# Altium PCB EMG-Arm-ELEC-V1.0.PcbDoc (part 5 of 5)
Units mil, origin at the board's own origin, x right, y up, seen from the top; angles counter-clockwise.
Board outline 8303.83 x 7532.25 mil, 2 copper layers (Top Layer, Bottom Layer), stack 3.556 mil thick; 303 components, 183 nets, 804 pads, 233 vias.
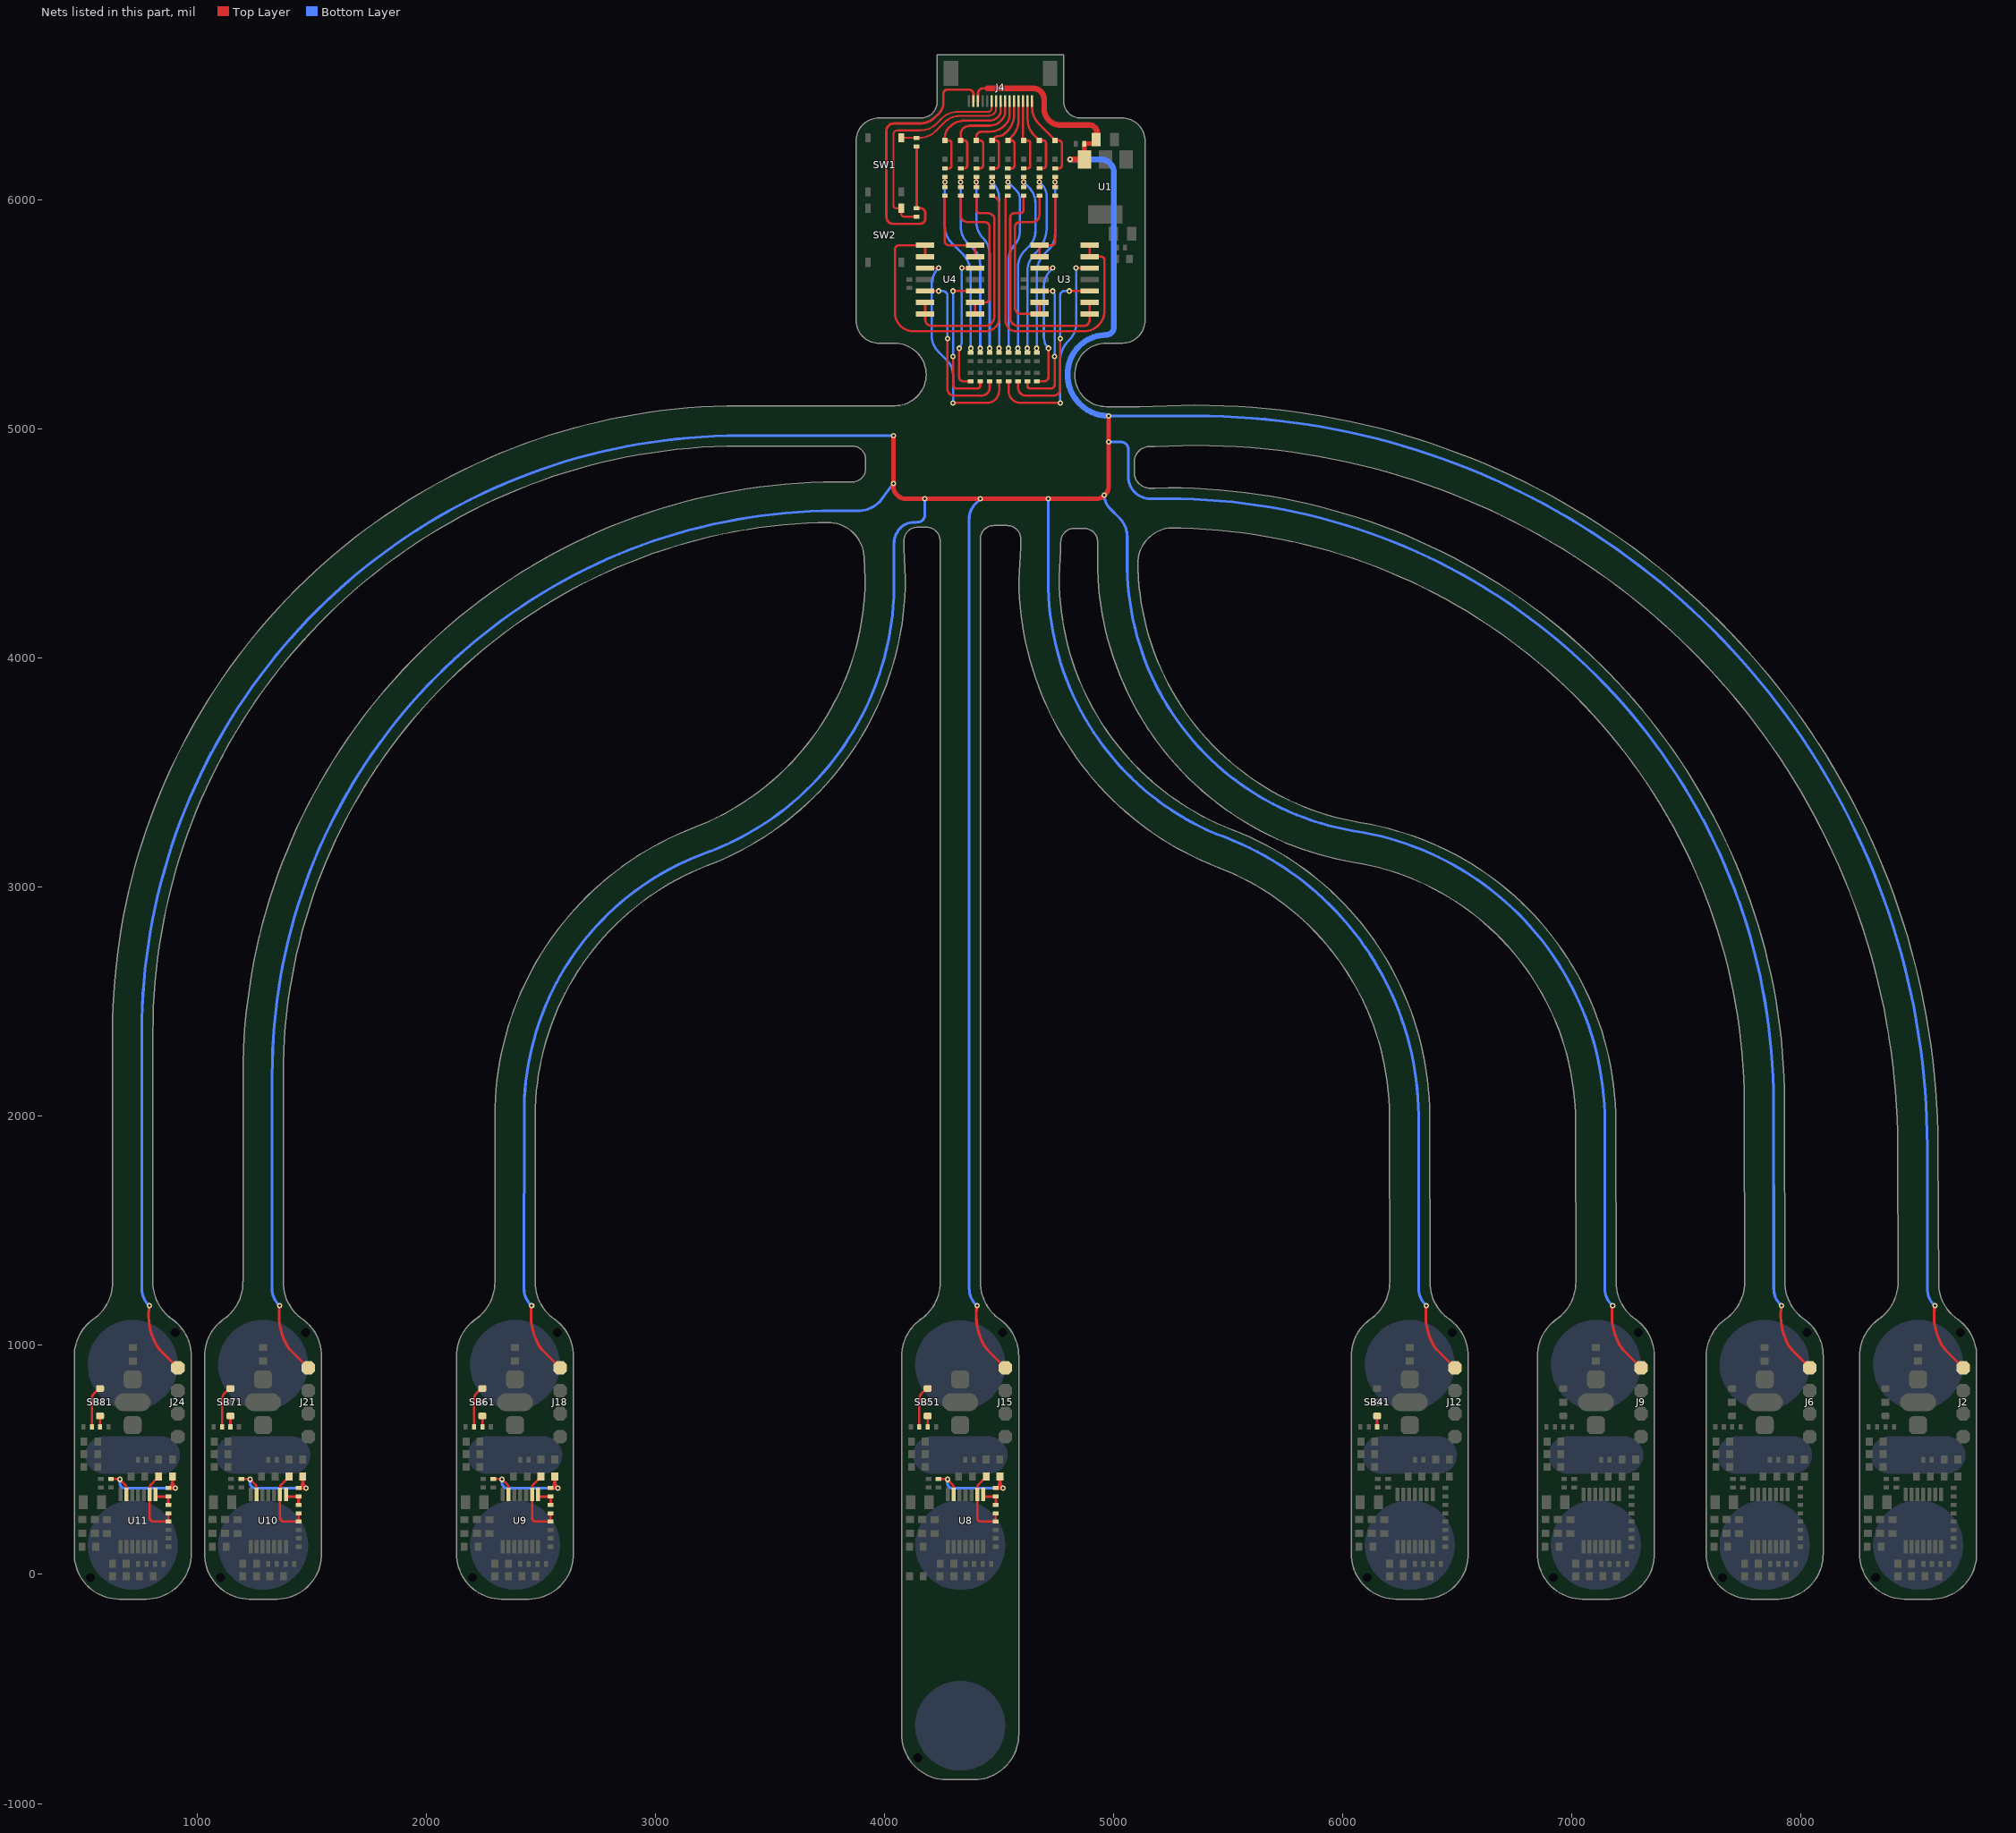
[diagram p4: the nets of this part, all layers, seen from the top]

## Via types
v1: diameter 23.62, hole 11.81, Top Layer to Bottom Layer, tented both sides, 233 vias

## Nets (pads, with @x,y where several pads share a name; then routed paths per layer and width w, separated by ;. In a path a pad name is that pad's centre, name@x,y a point inside that pad or via, vN(x,y) a via of type N, cw(c..) or ccw(c..) an arc to the next point about the centre after c; other vN are vias at no path point) (continued)
NetR53_1: R53.1 SB41.3 | length 47.7
  Top Layer w10: R53.1@6151.58,644.29 SB41.3@6151.58,691.97
NetR63_1: R63.1 R64.1 R68.1 U8.2 | length 304.5
  Top Layer w10: R63.1@4433.06,414.12 4411.92,392.97 ccw(c4426.01,378.88) 4406.08,378.88 U8.2@4406.08,349.35 4406.08,247.87 ccw(c4422.81,247.87) 4422.81,231.14 R68.1@4483.25,231.14 ; R68.1@4487.25,231.14 R64.1@4487.25,267.19 R64.1@4492.42,267.19
NetR63_2: R63.2 R67.2 R69.2 U8.6 | length 516.4
  Top Layer w10: R67.2@4236.85,416.63 v1@4274.22,416.63 ; v1@4276.73,414.12 4297.88,392.97 cw(c4283.78,378.88) 4303.72,378.88 U8.6@4303.72,349.35
  Top Layer w15: R69.2@4487.25,377.15 4505.33,377.15 ; R69.2@4496.92,380.47 ccw(c4476.6,400.79) 4505.33,400.79 ; R69.2@4497.79,376.35 v1@4515.87,376.35 ; 4505.33,377.35 R63.2@4505.33,428.23 ; 4505.33,402.79 ccw(c4534.06,402.79) v1@4513.74,382.47
  Bottom Layer w12: v1(4275.85,415) 4275.85,398.05 ccw(c4296.55,398.05) 4296.55,377.35 v1(4518.87,377.35)
NetR64_2: R64.2 R69.1 U8.1 | length 84.5
  Top Layer w12: U8.1@4434.53,340.29 R69.1@4483.1,340.29 ; R64.2@4487.25,304.19 R69.1@4487.25,340.15
NetR65_2: R65.2 SB51.1 | length 182.7
  Top Layer w10: R65.2@4153.46,644.3 4153.46,766.03 cw(c4189.42,766.03) 4166.43,793.68 4179.42,804.47 SB51.1@4189.42,811.97
NetR66_1: R66.1 SB51.3 | length 47.7
  Top Layer w10: R66.1@4189.42,644.3 SB51.3@4189.42,691.97
NetR76_1: R76.1 R77.1 R81.1 U9.2 | length 304.5
  Top Layer w10: R76.1@2489.58,414.11 2468.43,392.97 ccw(c2482.53,378.87) 2462.6,378.87 U9.2@2462.6,349.35 2462.6,247.87 ccw(c2479.33,247.87) 2479.33,231.14 R81.1@2539.76,231.14 ; R81.1@2543.76,231.14 R77.1@2543.76,267.19 R77.1@2548.94,267.19
NetR76_2: R76.2 R80.2 R82.2 U9.6 | length 516.4
  Top Layer w10: R80.2@2293.36,416.63 v1@2330.74,416.63 ; v1@2333.25,414.11 2354.4,392.97 cw(c2340.3,378.87) 2360.23,378.87 U9.6@2360.23,349.35
  Top Layer w15: R82.2@2543.76,377.15 2561.85,377.15 ; R82.2@2553.43,380.47 ccw(c2533.12,400.79) 2561.85,400.79 ; R82.2@2554.3,376.35 v1@2572.39,376.35 ; 2561.85,377.35 R76.2@2561.85,428.23 ; 2561.85,402.79 ccw(c2590.57,402.79) v1@2570.26,382.47
  Bottom Layer w12: v1(2332.36,415) 2332.36,398.05 ccw(c2353.07,398.05) 2353.07,377.35 v1(2575.39,377.35)
NetR77_2: R77.2 R82.1 U9.1 | length 84.5
  Top Layer w12: U9.1@2491.04,340.29 R82.1@2539.62,340.29 ; R77.2@2543.76,304.19 R82.1@2543.76,340.15
NetR78_2: R78.2 SB61.1 | length 182.7
  Top Layer w10: R78.2@2209.98,644.29 2209.98,766.03 cw(c2245.93,766.03) 2222.95,793.68 2235.93,804.47 SB61.1@2245.93,811.97
NetR79_1: R79.1 SB61.3 | length 47.7
  Top Layer w10: R79.1@2245.93,644.29 SB61.3@2245.93,691.97
NetR89_1: R89.1 R90.1 R94.1 U10.2 | length 304.5
  Top Layer w10: R89.1@1389.8,414.12 1368.65,392.97 ccw(c1382.75,378.87) 1362.81,378.87 U10.2@1362.81,349.35 1362.81,247.87 ccw(c1379.54,247.87) 1379.54,231.14 R94.1@1439.98,231.14 ; R94.1@1443.98,231.14 R90.1@1443.98,267.19 R90.1@1449.15,267.19
NetR89_2: R89.2 R93.2 R95.2 U10.6 | length 516.4
  Top Layer w10: R93.2@1193.58,416.63 v1@1230.95,416.63 ; v1@1233.47,414.12 1254.61,392.97 cw(c1240.52,378.87) 1260.45,378.87 U10.6@1260.45,349.35
  Top Layer w15: R95.2@1443.98,377.15 1462.06,377.15 ; R95.2@1453.65,380.47 ccw(c1433.33,400.79) 1462.06,400.79 ; R95.2@1454.52,376.35 v1@1472.6,376.35 ; 1462.06,377.35 R89.2@1462.06,428.23 ; 1462.06,402.79 ccw(c1490.79,402.79) v1@1470.48,382.47
  Bottom Layer w12: v1(1232.58,415) 1232.58,398.05 ccw(c1253.29,398.05) 1253.29,377.35 v1(1475.6,377.35)
NetR90_2: R90.2 R95.1 U10.1 | length 84.5
  Top Layer w12: U10.1@1391.26,340.29 R95.1@1439.83,340.29 ; R90.2@1443.98,304.19 R95.1@1443.98,340.15
NetR91_2: R91.2 SB71.1 | length 182.7
  Top Layer w10: R91.2@1110.19,644.29 1110.19,766.03 cw(c1146.15,766.03) 1123.17,793.68 1136.15,804.47 SB71.1@1146.15,811.97
NetR92_1: R92.1 SB71.3 | length 47.7
  Top Layer w10: R92.1@1146.15,644.29 SB71.3@1146.15,691.97
NetR102_1: R102.1 R103.1 R107.1 U11.2 | length 304.5
  Top Layer w10: R102.1@820.82,414.11 799.67,392.97 ccw(c813.77,378.87) 793.84,378.87 U11.2@793.84,349.35 793.84,247.87 ccw(c810.57,247.87) 810.57,231.14 R107.1@871,231.14 ; R107.1@875,231.14 R103.1@875,267.19 R103.1@880.18,267.19
NetR102_2: R102.2 R106.2 R108.2 U11.6 | length 516.4
  Top Layer w10: R106.2@624.6,416.63 v1@661.98,416.63 ; v1@664.49,414.11 685.64,392.97 cw(c671.54,378.87) 691.47,378.87 U11.6@691.47,349.35
  Top Layer w15: R108.2@875,377.15 893.09,377.15 ; R108.2@884.67,380.47 ccw(c864.36,400.79) 893.09,400.79 ; R108.2@885.54,376.35 v1@903.63,376.35 ; 893.09,377.35 R102.2@893.09,428.23 ; 893.09,402.79 ccw(c921.82,402.79) v1@901.5,382.47
  Bottom Layer w12: v1(663.6,415) 663.6,398.05 ccw(c684.31,398.05) 684.31,377.35 v1(906.63,377.35)
NetR103_2: R103.2 R108.1 U11.1 | length 84.5
  Top Layer w12: U11.1@822.28,340.29 R108.1@870.86,340.29 ; R103.2@875,304.19 R108.1@875,340.15
NetR104_2: R104.2 SB81.1 | length 182.7
  Top Layer w10: R104.2@541.22,644.29 541.22,766.03 cw(c577.17,766.03) 554.19,793.68 567.17,804.47 SB81.1@577.17,811.97
NetR105_1: R105.1 SB81.3 | length 47.7
  Top Layer w10: R105.1@577.17,644.29 SB81.3@577.17,691.97
NetSB91_1: SB91.1 U3.1 U3.2 | length 328
  Top Layer w10: U3.2@4677.98,5753.82 U3.1@4677.98,5803.82 4731.32,5803.82 ccw(c4731.32,5818.52) 4746.02,5818.52 SB91.1@4746.02,6020.12
NetSB92_1: SB92.1 U3.6 U3.7 | length 746.6
  Top Layer w10: SB92.1@4677.28,6020.12 4677.28,5935.42 cw(c4646.31,5935.42) 4646.31,5904.45 4591.6,5904.45 ccw(c4591.6,5883.85) 4571,5883.85 4571,5529.1 ccw(c4596.28,5529.1) 4596.28,5503.82 U3.7@4677.98,5503.82 U3.6@4677.98,5553.82
NetSB93_1: SB93.1 U3.8 U3.9 | length 1035.9
  Top Layer w10: SB93.1@4608.54,6020.12 4608.54,5959.85 cw(c4591.6,5959.85) 4591.6,5942.91 4566.53,5942.91 ccw(c4566.53,5926.42) 4550.03,5926.42 4550.03,5485.6 ccw(c4583.78,5485.6) 4583.78,5451.86 4872.83,5451.86 ccw(c4872.83,5475.06) 4896.02,5475.06 U3.8@4896.02,5503.82 U3.9@4896.02,5553.82
NetSB94_1: SB94.1 U3.13 U3.14 | length 1406.7
  Top Layer w10: SB94.1@4539.8,6020.12 4536.3,6020.12 4532.3,6016.12 4532.3,6012.61 4529.96,6010.26 4529.96,5474.84 ccw(c4577.02,5474.84) 4577.02,5427.78 4871.04,5427.78 ccw(c4871.04,5518.79) 4962.06,5518.79 4962.06,5738.3 ccw(c4946.54,5738.3) 4946.54,5753.82 U3.13@4896.02,5753.82 U3.14@4896.02,5803.82
NetSB95_1: SB95.1 U4.1 U4.2 | length 1551.7
  Top Layer w10: U4.2@4178.96,5753.82 U4.1@4178.96,5803.82 4066.46,5803.82 ccw(c4066.46,5784.24) 4046.88,5784.24 4046.88,5509.02 ccw(c4128.12,5509.02) 4128.12,5427.78 4442,5427.78 ccw(c4442,5488.05) 4502.28,5488.05 4502.28,5984.72 ccw(c4471.06,5984.72) 4485.82,6012.22 4478.56,6016.12 SB95.1@4471.06,6020.12
NetSB96_1: SB96.1 U4.6 U4.7 | length 1003.4
  Top Layer w10: U4.6@4178.96,5553.82 U4.7@4178.96,5503.82 4178.96,5479.04 ccw(c4206.14,5479.04) 4206.14,5451.86 4439.86,5451.86 ccw(c4439.86,5493.41) 4481.41,5493.41 4481.41,5915.95 ccw(c4454.45,5915.95) 4454.45,5942.91 4419.26,5942.91 cw(c4419.26,5959.85) 4402.32,5959.85 SB96.1@4402.32,6020.12
NetSB97_1: SB97.1 U4.8 U4.9 | length 675.1
  Top Layer w10: SB97.1@4333.58,6020.12 4333.58,5935.42 ccw(c4364.55,5935.42) 4364.55,5904.45 4438.14,5904.45 cw(c4438.14,5882.82) 4459.77,5882.82 4459.77,5571.59 cw(c4442,5571.59) 4442,5553.82 U4.9@4397,5553.82 U4.8@4397,5503.82
NetSB98_1: SB98.1 U4.13 U4.14 | length 391
  Top Layer w10: SB98.1@4264.84,6020.12 4264.84,5821.22 ccw(c4282.25,5821.22) 4282.25,5803.82 U4.14@4397,5803.82 4397,5801 U4.13@4397,5753.82
NetSB101_2: SB101.2 U3.3 | length 612.6
  Top Layer w10: SB101.2@4666.06,5209.85 4698.63,5209.85 ccw(c4698.63,5228.35) 4717.13,5228.35 v1(4717.13,5353.88) ; U3.3@4677.98,5703.82 v1(4736.02,5703.82)
  Bottom Layer w10: v1(4717.13,5353.88) cw(c4766.45,5403.2) 4696.7,5403.2 4696.7,5623.08 cw(c4796.7,5623.08) 4725.99,5693.79 v1(4736.02,5703.82)
NetSB102_2: SB102.2 U3.5 | length 624.2
  Top Layer w10: SB102.2@4624.92,5209.85 4624.92,5189.68 ccw(c4636.6,5189.68) 4636.6,5178 4726.55,5178 ccw(c4726.55,5195.25) 4743.8,5195.25 v1(4743.8,5317.66) ; U3.5@4677.98,5603.82 v1(4736.02,5603.82)
  Bottom Layer w10: v1(4736.02,5603.82) cw(c4717.23,5585.03) 4738.63,5600.79 cw(c4717.23,5585.03) 4743.8,5585.03 v1(4743.8,5317.66)
NetSB103_2: SB103.2 U3.10 | length 796.4
  Top Layer w10: SB103.2@4583.78,5209.85 4583.78,5182.35 ccw(c4619.13,5182.35) 4619.13,5147 4739.86,5147 ; 4739.9,5147 ccw(c4739.9,5175.23) 4768.13,5175.23 v1(4768.13,5396.64) ; v1(4807.98,5603.82) U3.10@4896.02,5603.82
  Bottom Layer w10: v1(4768.13,5396.64) 4768.13,5584.58 cw(c4787.37,5584.58) 4787.37,5603.82 v1(4807.98,5603.82)
NetSB104_2: SB104.2 U3.12 | length 964.4
  Top Layer w10: SB104.2@4542.64,5209.85 4542.64,5168.25 ccw(c4595.89,5168.25) 4595.89,5115 v1(4768.13,5115) ; v1(4837.98,5703.82) U3.12@4896.02,5703.82
  Bottom Layer w10: v1(4768.13,5115) 4768.13,5297.52 ; 4768.13,5297.57 cw(c4895.06,5297.57) 4805.32,5387.34 4808.7,5390.71 ccw(c4737.98,5461.42) 4837.98,5461.42 v1(4837.98,5703.82) ; v1@4831.46,5703.82 v1@4832.07,5703.2
NetSB105_2: SB105.2 U4.3 | length 958.6
  Top Layer w10: U4.3@4178.96,5703.82 v1(4237,5703.82) ; v1(4300.33,5115) 4448.24,5115 ccw(c4448.24,5168.25) 4501.49,5168.25 SB105.2@4501.49,5209.85
  Bottom Layer w10: v1(4237,5703.82) 4236.39,5703.2 ccw(c4307.1,5632.49) 4207.1,5632.49 4207.1,5409.43 ccw(c4307.1,5409.43) 4236.39,5338.72 4274.63,5300.47 cw(c4212.6,5238.44) 4300.33,5238.44 v1(4300.33,5115)
NetSB106_2: SB106.2 U4.5 | length 764.8
  Top Layer w10: U4.5@4178.96,5603.82 v1(4237,5603.82) ; v1(4276,5396.64) 4276,5175.23 ccw(c4304.23,5175.23) 4304.23,5147 ; 4304.27,5147 4425,5147 ccw(c4425,5182.35) 4460.35,5182.35 SB106.2@4460.35,5209.85
  Bottom Layer w10: v1(4237,5603.82) 4255.18,5603.82 cw(c4255.18,5583) 4276,5583 4276,5508.32 v1(4276,5396.64)
NetSB107_2: SB107.2 U4.10 | length 660.8
  Top Layer w10: v1(4300.33,5317.66) 4300.33,5195.25 ccw(c4317.58,5195.25) 4317.58,5178 4407.53,5178 ccw(c4407.53,5189.68) 4419.21,5189.68 SB107.2@4419.21,5209.85 ; v1(4300.33,5603.82) U4.10@4397,5603.82
  Bottom Layer w10: v1(4300.33,5317.66) v1(4300.33,5603.82)
NetSB108_2: SB108.2 U4.12 | length 598.3
  Top Layer w10: v1(4327,5353.88) 4327,5228.35 ccw(c4345.5,5228.35) 4345.5,5209.85 SB108.2@4378.06,5209.85 ; v1(4338.96,5703.82) U4.12@4397,5703.82
  Bottom Layer w10: v1(4327,5353.88) ccw(c4298.11,5382.76) 4338.96,5382.76 v1(4338.96,5703.82)
SENSOR1: R23.2 SB01.2 SB91.2 | length 814.6
  Top Layer w10: SB91.2@4746.02,6056.83 SB91.2@4746.02,6057.12 v1(4746.02,6079.67) R23.2@4746.02,6102.5
  Top Layer w15: SB01.2@4666.06,5334.35 v1(4666.06,5353.88)
  Bottom Layer w10: v1(4666.06,5353.88) 4666.06,5682.39 ; 4666.06,5682.44 cw(c4786.29,5682.44) 4701.32,5767.49 4716.73,5782.91 ; 4716.77,5782.94 ccw(c4646.02,5853.62) 4746.02,5853.62 v1(4746.02,6079.67)
SENSOR1_O: D8.2 J4.15 R23.1 | length 377.9
  Top Layer w10: J4.15@4645.65,6432.31 4645.65,6404.35 ccw(c4745.65,6404.35) 4674.94,6333.64 4746.02,6262.56 D8.2@4746.02,6261 4763.21,6261 cw(c4763.21,6249.19) 4775.02,6249.19 4775.02,6151.31 cw(c4763.21,6151.31) 4763.21,6139.5 R23.1@4746.02,6139.5
SENSOR2: R22.2 SB02.2 SB92.2 | length 825
  Top Layer w10: SB92.2@4677.28,6056.83 SB92.2@4677.28,6057.12 v1(4677.28,6079.67) R22.2@4677.28,6102.5
  Top Layer w15: SB02.2@4624.92,5334.35 v1(4624.92,5353.88)
  Bottom Layer w10: v1(4624.92,5353.88) 4624.92,5691.65 cw(c4724.92,5691.65) 4654.21,5762.36 4662.1,5770.25 ccw(c4547.18,5885.2) 4709.72,5885.2 ; v1(4677.28,6079.67) 4687.44,6069.5 cw(c4633.66,6015.72) 4709.72,6015.72 4709.72,5885.24
SENSOR2_O: D7.2 J4.14 R22.1 | length 357.6
  Top Layer w10: J4.14@4625.97,6432.31 4625.97,6353.73 ccw(c4725.97,6353.73) 4655.26,6283.02 D7.2@4677.28,6261 4694.47,6261 cw(c4694.47,6249.19) 4706.28,6249.19 4706.28,6151.31 cw(c4694.47,6151.31) 4694.47,6139.5 R22.1@4677.28,6139.5
SENSOR3: R20.2 SB03.2 SB93.2 | length 811.4
  Top Layer w10: SB93.2@4608.54,6056.83 SB93.2@4608.54,6057.12 v1(4608.54,6079.67) R20.2@4608.54,6102.5
  Bottom Layer w10: v1(4583.78,5353.88) 4583.78,5708.85 cw(c4683.78,5708.85) 4613.07,5779.56 4630.71,5797.21 ccw(c4560,5867.92) 4660,5867.92 4660,5986.79 ccw(c4560,5986.79) 4630.71,6057.5 v1(4608.54,6079.67)
SENSOR3_O: D6.2 J4.13 R20.1 | length 341.3
  Top Layer w10: J4.13@4606.28,6432.31 4606.28,6266.45 ccw(c4614,6266.45) D6.2@4608.54,6261 4625.73,6261 cw(c4625.73,6249.19) 4637.54,6249.19 4637.54,6151.31 cw(c4625.73,6151.31) 4625.73,6139.5 R20.1@4608.54,6139.5
SENSOR4: R19.2 SB04.2 SB94.2 | length 823.1
  Top Layer w10: SB94.2@4539.8,6056.83 SB94.2@4539.8,6057.12 v1(4539.8,6079.67) R19.2@4539.8,6102.5
  Top Layer w15: SB04.2@4542.64,5334.35 v1(4542.64,5353.88)
  Bottom Layer w10: v1(4539.8,6079.67) 4576.7,6042.77 cw(c4537.74,6003.8) 4592.84,6003.8 4592.84,5868.84 cw(c4492.84,5868.84) 4572.85,5808.85 cw(c4492.84,5868.84) 4563.55,5798.13 4562.63,5797.21 ccw(c4642.64,5737.21) 4542.64,5737.21 v1(4542.64,5353.88)
SENSOR4_O: D5.2 J4.12 R19.1 | length 355.8
  Top Layer w10: R19.1@4539.8,6139.5 4556.99,6139.5 ccw(c4556.99,6151.31) 4568.8,6151.31 4568.8,6249.19 ccw(c4556.99,6249.19) 4556.99,6261 D5.2@4539.8,6261 4557.31,6278.51 ccw(c4486.6,6349.22) 4586.6,6349.22 J4.12@4586.6,6432.31
SENSOR5: R18.2 SB05.2 SB95.2 | length 799.4
  Top Layer w10: SB95.2@4471.06,6056.83 SB95.2@4471.06,6057.12 v1(4471.06,6079.67) R18.2@4471.06,6102.5
  Top Layer w15: SB05.2@4501.49,5334.35 v1(4501.49,5353.88)
  Bottom Layer w10: v1(4471.06,6079.67) cw(c4404,6008.85) 4501.49,6008.85 v1(4501.49,5353.88)
SENSOR5_O: D4.2 J4.11 R18.1 | length 387.8
  Top Layer w10: R18.1@4471.06,6139.5 4488.25,6139.5 ccw(c4488.25,6151.31) 4500.06,6151.31 4500.06,6249.19 ccw(c4488.25,6249.19) 4488.25,6261 D4.2@4471.06,6261 4483.94,6273.88 cw(c4499.63,6258.19) 4489.05,6277.69 cw(c4499.63,6258.19) 4499.63,6280.38 ccw(c4499.63,6318.51) 4526.57,6291.53 4537.79,6302.74 ccw(c4467.96,6372.52) 4566.68,6372.56 J4.11@4566.68,6432.07
SENSOR6: R16.2 SB06.2 SB96.2 | length 806.5
  Top Layer w10: SB96.2@4402.32,6056.83 SB96.2@4402.32,6057.12 v1(4402.32,6079.67) R16.2@4402.32,6102.5
  Top Layer w15: SB06.2@4460.35,5334.35 v1(4460.35,5353.88)
  Bottom Layer w10: v1(4402.32,6079.67) 4402.32,5905.1 ccw(c4502.32,5905.1) 4431.61,5834.39 cw(c4362.23,5765.01) 4460.35,5765.01 v1(4460.35,5353.88)
SENSOR6_O: D3.2 J4.10 R16.1 | length 440.3
  Top Layer w10: R16.1@4402.32,6139.5 4419.51,6139.5 ccw(c4419.51,6151.31) 4431.32,6151.31 4431.32,6249.19 ccw(c4419.51,6249.19) 4419.51,6261 D3.2@4402.32,6261 4402.32,6278.62 cw(c4419.59,6278.62) 4407.38,6290.83 cw(c4428.83,6269.39) 4428.83,6299.72 4461.78,6299.72 ; 4461.82,6299.72 ccw(c4461.82,6388.15) 4524.36,6325.62 4528.95,6330.21 ccw(c4484.76,6374.37) 4547.23,6374.37 J4.10@4547.23,6432.31
SENSOR7: R15.2 SB07.2 SB97.2 | length 817.8
  Top Layer w10: SB97.2@4333.58,6056.83 SB97.2@4333.58,6057.12 v1(4333.58,6079.67) R15.2@4333.58,6102.5
  Top Layer w15: SB07.2@4419.21,5334.35 v1(4419.21,5353.88)
  Bottom Layer w10: v1(4333.58,6079.67) 4333.58,5885.67 ccw(c4433.58,5885.67) 4362.87,5814.96 4389.92,5787.91 cw(c4319.21,5717.2) 4419.21,5717.2 v1(4419.21,5353.88)
SENSOR7_O: D2.2 J4.9 R15.1 | length 489.8
  Top Layer w10: R15.1@4333.58,6139.5 4350.77,6139.5 ccw(c4350.77,6151.31) 4362.58,6151.31 4362.58,6249.19 ccw(c4350.77,6249.19) 4350.77,6261 D2.2@4333.58,6261 4333.58,6288.21 cw(c4368.65,6288.21) 4343.85,6313 cw(c4373.9,6282.95) 4373.9,6325.45 4459.42,6325.45 ccw(c4459.42,6394.12) 4507.98,6345.56 4513.65,6351.23 ccw(c4480.08,6384.8) 4527.55,6384.8 J4.9@4527.54,6432.31
SENSOR8: R14.2 SB08.2 SB98.2 | length 828.2
  Top Layer w10: SB98.2@4264.84,6056.83 SB98.2@4264.84,6057.12 v1(4264.84,6079.67) R14.2@4264.84,6102.5
  Top Layer w15: SB08.2@4378.06,5334.35 v1(4378.06,5353.88)
  Bottom Layer w10: v1(4264.84,6079.67) 4264.84,5884.58 ccw(c4364.84,5884.58) 4294.13,5813.87 4341.5,5766.5 cw(c4253.23,5678.22) 4378.06,5678.23 v1(4378.06,5353.88)
SENSOR8_O: D1.2 J4.8 R14.1 | length 529.2
  Top Layer w10: R14.1@4264.84,6139.5 4282.03,6139.5 ccw(c4282.03,6151.31) 4293.84,6151.31 4293.84,6249.19 ccw(c4282.03,6249.19) 4282.03,6261 D1.2@4264.84,6261 4264.84,6275.08 cw(c4324.29,6275.08) 4282.26,6317.12 4283.87,6318.74 cw(c4354.58,6248.03) 4350.23,6347.93 cw(c4354.58,6248.03) 4354.58,6348.03 4457.81,6348.03 ccw(c4457.81,6405.31) 4498.32,6364.81 ccw(c4475.29,6387.84) 4507.86,6387.84 J4.8@4507.86,6432.31
SW1: J4.7 R17.1 SW1.3 | length 494.5
  Top Layer w8: SW1.3@4074.65,6272.18 R17.1@4141.67,6272.18 4153.24,6272.18 ccw(c4153.24,6372.18) 4223.95,6301.47 4261.19,6338.71 cw(c4331.9,6267.99) 4331.9,6367.99 4450.24,6367.99 ccw(c4450.24,6411.9) 4481.29,6380.86 ccw(c4464.66,6397.49) 4488.18,6397.49 J4.7@4488.18,6432.31
SW2: J4.6 R21.1 SW2.3 | length 954.4
  Top Layer w8: R21.1@4141.67,5928.18 4085.25,5928.18 cw(c4085.25,5938.78) 4074.65,5938.78 SW2.3@4074.65,5965.18 4051.83,5965.18 cw(c4051.83,5976.71) 4040.29,5976.71 4040.29,6288.05 cw(c4057.32,6288.05) 4057.32,6305.08 4157.57,6305.08 ccw(c4157.57,6405.08) 4228.28,6334.37 4250.63,6356.72 cw(c4321.34,6286.01) 4321.34,6386.01 4453.48,6386.01 ccw(c4453.48,6401.02) 4468.49,6401.02 J4.6@4468.49,6432.31
VBAT: C3.1 C4.2 J2.4 J4.3 J6.4 J9.4 J12.4 J15.4 J18.4 J21.4 J24.4 U1.3 | length 45927.3
  Top Layer w11: J4.3@4409.43,6432.31 4409.43,6467.12 cw(c4430.08,6467.12) 4415.48,6481.72 cw(c4432.52,6464.68) 4432.52,6488.78 4450.24,6488.78
  Top Layer w12: v1@792.53,1173.02 ccw(c1056.58,1131.86) 824.64,999.13 ccw(c1056.58,1131.86) 825,998.49 838.6,980.22 J24.4@916.65,902.17 ; v1@1361.51,1173.02 ccw(c1625.56,1131.86) 1393.62,999.13 ccw(c1625.56,1131.86) 1393.98,998.5 1407.58,980.22 J21.4@1485.63,902.17 ; v1@2461.29,1173.02 ccw(c2725.34,1131.86) 2493.4,999.13 ccw(c2725.34,1131.86) 2493.76,998.49 2507.36,980.22 J18.4@2585.41,902.17 ; v1@4404.78,1173.02 ccw(c4668.83,1131.86) 4436.88,999.13 ccw(c4668.83,1131.86) 4437.25,998.5 4450.84,980.22 J15.4@4528.9,902.17 ; v1@6366.94,1173.02 ccw(c6630.99,1131.86) 6399.05,999.13 ccw(c6630.99,1131.86) 6399.41,998.5 6413.01,980.22 J12.4@6491.06,902.17 ; v1@7179.65,1173.01 ccw(c7443.7,1131.86) 7211.76,999.12 ccw(c7443.7,1131.86) 7212.12,998.49 7225.72,980.21 J9.4@7303.78,902.16 ; v1@7916.4,1173.02 ccw(c8180.45,1131.86) 7948.51,999.13 ccw(c8180.45,1131.86) 7948.87,998.5 7962.47,980.22 J6.4@8040.53,902.17 ; v1@8585.88,1173.02 ccw(c8849.93,1131.86) 8617.99,999.13 ccw(c8849.93,1131.86) 8618.35,998.49 8631.95,980.22 J2.4@8710,902.17
  Top Layer w20: v1(4040,4971.89) v1(4040,4763.79) 4040,4751.1 ccw(c4094.21,4751.1) 4094.21,4696.89 v1(4177.12,4696.89) v1(4419.83,4696.89) v1(4716.26,4696.89) 4925.15,4696.89 ccw(c4925.15,4751.45) 4979.72,4751.45 v1(4979.72,4945) v1(4979.72,5057.89) ; C4.2@4873.23,6244.55 4873.23,6179.81 U1.3@4874.9,6178.15 ; C4.2@4873.36,6247.05 4915.45,6247.05 C3.1@4925.45,6257.05
  Top Layer w25: 4450.24,6488.78 4648.16,6488.78 cw(c4648.16,6438.33) 4698.61,6438.33 4698.61,6392.16 ccw(c4770.52,6400.09) 4770.52,6327.74 4867.76,6327.74 4896.89,6327.74 cw(c4896.89,6296.04) 4928.54,6297.77 4928.54,6296.84 4928.54,6295.58 4927.31,6282.38 C3.1@4925.45,6264.88 C3.1@4925.45,6257.05 ; v1(4811,6178.15) U1.3@4874.9,6178.15
  Bottom Layer w12: 758.93,1248.15 758.93,2366.67 cw(c3366.45,2364.36) 3368.75,4971.89 v1(4040,4971.89) ; 759.65,1247.42 ccw(c859.65,1247.42) 788.94,1176.71 v1(792.65,1173) ; v1(1361.63,1173) 1357.19,1177.44 cw(c1427.9,1248.15) 1327.9,1248.15 1327.9,1323.71 1328.53,2182.27 cw(c3786.93,2185.48) 3783.75,4643.89 3884.23,4643.89 3884.3,4643.89 ccw(c3884.35,4780) 3980.69,4683.85 ccw(c3972.15,4692.28) 3981.8,4685.14 3998.44,4707.62 v1(4040,4763.79) ; v1(2461.41,1173) 2456.98,1177.44 cw(c2527.69,1248.15) 2427.69,1248.15 2427.69,1323.71 2428.44,2002.78 cw(c3632.78,2018.42) 3240.11,3157.06 ccw(c2792.24,4324.9) 4042.9,4341.91 4042.9,4499.81 cw(c4142.9,4499.81) 4072.19,4570.52 cw(c4128.38,4514.33) 4128.38,4593.8 4135.58,4593.8 ccw(c4135.58,4652.54) 4145.38,4594.62 ccw(c4145.38,4626.36) 4166.22,4602.42 ccw(c4145.38,4626.36) 4177.12,4626.36 v1(4177.12,4696.89) ; v1(4404.9,1173) 4400.46,1177.44 cw(c4471.17,1248.15) 4400.12,1177.78 cw(c4471.17,1248.15) 4371.17,1248.15 4371.17,1342 4370.83,4547.57 4370.83,4606.47 cw(c4470.83,4606.47) 4400.12,4677.18 v1(4419.83,4696.89) ; v1(4716.26,4696.89) 4716.26,4341.81 ccw(c5911.96,4335.56) 5448.89,3233.15 cw(c5017.02,1989.97) 6333,2004.39 6333,1248.49 ccw(c6433,1248.49) 6362.29,1177.78 v1(6367.06,1173) ; v1(4961.02,4711.58) ccw(c5041.77,4711.58) 4984.67,4654.47 5030.44,4608.71 cw(c4947.67,4531.53) 5060.84,4531.53 5060.84,4429.76 ccw(c6242.63,4412.6) 6050.33,3246.43 cw(c5857.86,1973.04) 7145.71,1975.28 7145.88,1326.64 7145.88,1248.31 ccw(c7245.88,1248.31) 7175.17,1177.6 v1(7179.78,1172.99) ; v1(4979.72,4945) 5032.7,4945 cw(c5032.7,4911.89) 5065.81,4911.89 5065.81,4792.57 ccw(c5161.49,4792.57) 5161.49,4696.89 5240.75,4696.89 cw(c5242.95,2057.69) 7882.14,2059.89 7882.78,1342 7882.78,1248.17 ccw(c7982.78,1248.17) 7912.07,1177.46 v1(7916.53,1173) ; v1(4979.72,5057.89) 5359.75,5057.89 cw(c5361.7,1866.59) 8553,1868.53 ; 8553,1870.23 8553,1247.42 ccw(c8653,1247.42) 8582.29,1176.71 v1(8586,1173)
  Bottom Layer w25: v1(4811,6178.15) 4945.71,6178.15 cw(c4945.71,6121) 5002.85,6121 5002.85,5447.03 cw(c4967.75,5447.03) 4967.75,5411.92 ccw(c4970.19,5242.33) 4800.59,5240.77 4800.6,5239.38 ccw(c4981.15,5238.44) v1(4979.72,5057.89)
VCC_3V3: J4.2 R17.2 R21.2 | length 1457
  Top Layer w11: R17.2@4141.67,6235.18 R21.2@4141.67,5965.18 4158.67,5965.18 cw(c4158.67,5944.89) 4178.96,5944.89 4178.96,5919.18 cw(c4156.78,5919.18) 4156.78,5897 4039.44,5897 cw(c4039.44,5926.92) 4009.52,5926.92 4009.52,6303.11 cw(c4041.38,6303.11) 4041.38,6334.96 4153.48,6334.96 ccw(c4153.48,6434.96) 4224.19,6364.25 4239.01,6379.08 ccw(c4192.15,6425.94) 4258.42,6425.94 4258.42,6466.71 cw(c4274.48,6466.71) 4274.48,6482.78 4370.11,6482.78 cw(c4370.11,6463.13) 4389.75,6463.13 J4.2@4389.75,6432.31
pads on no net: J4.4 J4.5 SW1.1 SW1.4 SW2.1 SW2.4

## Polygon pours and split planes (outlines as drawn)
no net on Top Overlay "NONET_L01_P-001" (solid): 4205,-631.06 4205,-276.06 cw(c4305,-276.06) 4305,-176.06 4365,-176.06 cw(c4365,-276.06) 4465,-276.06 4465,-631.06 cw(c4365,-631.06) 4365,-731.06 4305,-731.06 cw(c4305,-631.06)
no net on Top Overlay "NONET_L01_P-001" (solid): 4222.7,-496.27 4222.7,-680 4441.74,-680 4441.51,-496.27 cw(c4332.11,-660) 4529.03,-660 cw(c4332.11,-660) 4332.11,-856.92 cw(c4332.11,-660) 4135.18,-660 cw(c4332.11,-660)
5V on Top Layer "5V_L01_P000" (hatched 45Degree grid 20 track 10, pour order 0): 4066,4984 cw(c4115,4984) 4115,5033 4914.93,5033 cw(c4914.93,5001.93) 4946,5001.93 4946,4979.54 4946,4770 cw(c4904,4770) 4904,4728 4122,4728 cw(c4122,4784) 4066,4784
GND on Bottom Layer "GND_L02_P002" (hatched 45Degree grid 20 track 10, remove dead copper, pour order 2): 3877.31,5520.34 5138.41,5520.34 5138.41,6259.25 ccw(c5038.42,6259.25) 5109.12,6329.96 5109.11,6329.98 ccw(c5038.43,6259.3) 5038.43,6359.25 4852.38,6359.25 cw(c4851.99,6415.94) 4811.46,6376.3 4796.54,6391.23 cw(c4826.33,6421.02) 4784.2,6421.02 4784.2,6636 4231.52,6636 4231.52,6421.01 cw(c4189.4,6421.01) 4219.18,6391.23 4204.26,6376.3 cw(c4163.51,6417.05) 4163.51,6359.42 3977.31,6359.42 ccw(c3977.31,6259.42) 3877.31,6259.42

## Other copper
Top Layer:
  rectangle net GND: 4382.4,488.73 4407.65,513.73
  rectangle net GND: 770.15,488.73 795.4,513.73
  rectangle net GND: 1339.13,488.73 1364.38,513.73
  rectangle net GND: 2438.91,488.73 2464.16,513.73
  rectangle net GND: 6344.56,488.73 6369.81,513.73
  rectangle net GND: 7157.28,488.72 7182.53,513.72
  rectangle net GND: 7894.02,488.73 7919.27,513.73
  rectangle net GND: 8563.5,488.72 8588.75,513.72

## Silkscreen, mask and mechanical layers (free items; w line width, h text height)
Top Overlay:
  circle w5: c4446.27,4935.21 r6
  circle w5: c4428.33,4870.91 r6
  circle w5: c4449.59,4855.89 r6
  circle w5: c4548.67,4829.98 r5
  circle w5: c4559.66,4815.07 r5
  circle w5: c4568.3,4798.58 r5
  circle w5: c4577.72,4782.1 r5
  circle w5: c4554.72,4954.02 r7.5
  circle w5: c4504.38,4907.7 r5
  circle w5: c4511.38,4891.22 r5
  circle w5: c4520.7,4875.52 r5
  pour cut-out: 4271.31,-580.46 4263.28,-580.46 4263.28,-748.9 4428.88,-748.9 4428.88,-594.67 4392.55,-594.67 4392.55,-256.24 4271.31,-256.24
  lines w5: 4428.33,4876.91 4439.33,4887.91 4448.33,4896.91 4484.33,4896.91 4484.33,4909.06 4469.23,4909.06 4466.18,4909.06 4459.33,4915.91 4448.33,4927.91 ; 4434.33,4870.91 4452.09,4888.67 4452.24,4888.67 4484.33,4888.67 4484.33,4878.18 4465.19,4859.03 4455.33,4859.03 ; 4453.33,4933.91 4469.51,4916.73 ; 4455.33,4851.8 4469.22,4851.8 4483.33,4865.91 4492.38,4874.96 4492.38,4879.88 4492.38,4949.91 4539.65,4949.91 4540.81,4951.07 ; 4477.34,4916.73 4469.51,4916.73 ; 4493.45,4782.1 4572.72,4782.1 ; 4498.16,4798.58 4563.3,4798.58 ; 4506.01,4814.28 4554.72,4814.28 ; 4509.38,4907.7 4562.53,4907.7 ; 4516.38,4891.22 4554.68,4891.22 ; 4520.14,4829.98 4543.67,4829.98 ; 4525.7,4875.52 4539.77,4875.52 ; 4531.13,4844.12 4541.34,4844.12 ; 4540.71,4951.55 cw(c4554.72,4954.02) 4540.71,4956.49 ; 4540.81,4956.98 4540.74,4956.91 4539.74,4957.91 4492.38,4957.91 4492.38,5011.96 4515.33,5034.91 4554.49,5034.91 4578.63,5010.29 4578.63,4920.27 cw(c4527.07,4920.27) 4563.53,4883.81 ; 4543.25,4945.99 ccw(c4554.72,4954.02) 4546.69,4942.55 ; 4543.25,4962.05 cw(c4554.72,4954.02) 4546.69,4965.49 ; 4548,4870 4519.25,4854.1 4495.66,4832.09 ccw(c4549.58,4778.17) 4473.33,4778.17 4486.38,4778.17 cw(c4561.24,4778.17) 4508.31,4831.11 4533.09,4855.89 4563.32,4883.37 ; 4552.25,4940.01 ccw(c4554.72,4954.02) 4557.19,4940.01 ; 4552.25,4968.03 cw(c4554.72,4954.02) 4557.19,4968.03 ; 4562.75,4942.55 ccw(c4554.72,4954.02) 4566.19,4945.99 ; 4562.75,4965.49 cw(c4554.72,4954.02) 4566.19,4962.05 ; 4563.64,4883.7 4580.59,4900.64 ccw(c4564.33,4916.91) 4587.33,4916.91 4587.33,4977.91 4587.33,5013.91 4582.33,5018.91 4558.33,5042.91 4484.33,4968.91 4484.33,4916.73 4469.5,4916.73 ; 4568.73,4951.55 ccw(c4554.72,4954.02) 4568.73,4956.49
  lines w15: 4228.26,4667.78 4262.8,4740 4266.72,4740 4299.7,4668.56 ; 4319.62,4740 4354.17,4740 cw(c4354.17,4703.05) 4391.12,4703.05 ; 4321.59,4696.82 4321.59,4668.56 4352.59,4668.56 4358.12,4668.56 ccw(c4358.12,4701.53) 4391.09,4701.53 4391.09,4703.05 ; 4409.51,4680.34 ccw(c4422.86,4680.34) 4422.86,4666.99 ; 4442.09,4666.99 4457.79,4666.99 ccw(c4457.79,4681.91) 4472.71,4681.91 4472.71,4683.48 ccw(c4456.22,4683.48) 4456.22,4699.96 4431.49,4699.96 cw(c4431.49,4720.37) 4411.08,4720.37 cw(c4430.71,4720.37) 4430.71,4740 4445.23,4740 ; 4478.02,4740 4544.75,4740 ; 4511.38,4664.64 4511.38,4713.78 ; 4566.13,4740 4605.38,4740 cw(c4605.38,4718.02) 4627.36,4718.02 cw(c4607.73,4718.02) 4607.73,4698.39 ; 4568.48,4666.21 4568.48,4698.39 4602.24,4698.39 4607.73,4698.39 ; 4628.56,4665.23 4607.73,4698.39 ; 4654.84,4690.54 ccw(c4679.17,4690.54) 4679.17,4666.21 4686.63,4666.21 4692.13,4666.21 ; 4654.84,4691.33 4654.84,4709.78 ; 4654.84,4723.78 4654.84,4740 ; 4693.3,4666.21 ccw(c4693.3,4691.33) 4718.43,4691.33 ; 4718.43,4711.78 4718.43,4740 ; 4747.87,4665.42 4747.87,4739.22 4791.44,4688.19 4835.01,4739.22 4834.61,4665.42
  text "Rev-v1.0" at 3945.49,5425.71 h35 r90
  text "ELECTRODE # 8" at 764.41,1286.02 h100 r90
  text "ELECTRODE # 7" at 1332.41,1286.02 h100 r90
  text "ELECTRODE # 6" at 2432.41,1286.02 h100 r90
  text "ELECTRODE # 3" at 7150.41,1286.02 h100 r90
  text "ELECTRODE # 2" at 7887.41,1286.02 h100 r90
  text "ELECTRODE # 1" at 8556.47,1286.02 h100 r90
  text "ELECTRODE # 4" at 6338.41,1284.19 h100 r90
  text "ELECTRODE # 5" at 4375.41,1283.25 h100 r90
  text "-REF" at 4380,-569.43 h180 r90
  text "V" at 4422.26,-744.24 h300 r90
Board Outline:
  drawing of 187 lines, arcs and shapes, not listed
Fabrication:
  drawing of 906 lines, arcs and shapes, not listed
  text "Layer" at 10755.58,6907 h60
  text "Name" at 11165.49,6907 h60
  text "Material" at 12095.23,6907 h60
  text "Thickness" at 12955,6907 h60
  text "Constant" at 13604.84,6907 h60
  text "Flex Layer Stack" at 14174.7,6907 h60
  text "Top Overlay" at 11165.49,6787 h60
  text "Top Solder" at 11165.49,6667 h60
  text "Solder Resist" at 12095.23,6667 h60
  text "0.013mm" at 12955,6667 h60
  text "3.5" at 13604.84,6667 h60
  text "1" at 10755.58,6547 h60
  text "Top Layer" at 11165.49,6547 h60
  text "0.035mm" at 12955,6547 h60
  text "Dielectric 1" at 11165.49,6427 h60
  text "Flex" at 12095.23,6427 h60
  text "0.020mm" at 12955,6427 h60
  text "4.8" at 13604.84,6427 h60
  text "2" at 10755.58,6307 h60
  text "Bottom Layer" at 11165.49,6307 h60
  text "0.035mm" at 12955,6307 h60
  text "Bottom Solder" at 11165.49,6187 h60
  text "Solder Resist" at 12095.23,6187 h60
  text "0.013mm" at 12955,6187 h60
  text "3.5" at 13604.84,6187 h60
  text "Bottom Overlay" at 11165.49,6067 h60
  text "Stiffener Area" at 1574.48,5980.61 h60
  text "Total board thickness:" at 10755.58,5947 h60
  text "0.116mm" at 12955,5947 h60
  text "Stiffener Area" at 4113.48,5915.61 h60
  text "Material : FR4" at 1572.13,5875.82 h60
  text "Material : FR4" at 4111.13,5810.82 h60
  text "Thickness : 0.20mm" at 1465.62,5769.95 h60
  text "Thickness : 0.20mm" at 4004.62,5704.95 h60
  text "Stiffener Area" at 4102.2,4910 h60
  text "Stiffener Area" at 13395.62,4850.95 h60
  text "Thickness : 0.25mm" at 3981.2,4801 h60
  text "Thickness : 0.25mm" at 13274.62,4741.95 h60
  text "Material : Polyimide" at 3955.05,4687.16 h60
  text "Material : Polyimide" at 13248.47,4628.11 h60
  text "Material : Polyimide" at 738.25,1192.42 h60 r90
  text "Material : Polyimide" at 1308.68,1192.42 h60 r90
  text "Material : Polyimide" at 2425.32,1192.42 h60 r90
  text "Material : Polyimide" at 4362.32,1192.42 h60 r90
  text "Material : Polyimide" at 6307.43,1192.42 h60 r90
  text "Material : Polyimide" at 7114.93,1192.42 h60 r90
  text "Material : Polyimide" at 7860.58,1192.42 h60 r90
  text "Material : Polyimide" at 8532.32,1192.42 h60 r90
  text "Cut-out" at 623.68,911.8 h30
  text "Cut-out" at 1192.65,911.8 h30
  text "Cut-out" at 2292.44,911.8 h30
  text "Cut-out" at 4235.92,911.8 h30
  text "Cut-out" at 6198.08,911.8 h30
  text "Cut-out" at 7010.8,911.8 h30
  text "Cut-out" at 7747.55,911.8 h30
  text "Cut-out" at 8417.02,911.8 h30
  text "Cut-out" at 5012.06,896.66 h30
  text "Material" at 526.12,644.41 h60
  text "Material" at 1095.1,644.41 h60
  text "Material" at 2194.88,644.41 h60
  text "Material" at 4138.36,644.42 h60
  text "Material" at 6100.53,644.41 h60
  text "Material" at 6913.24,644.41 h60
  text "Material" at 7649.99,644.42 h60
  text "Material" at 8319.47,644.41 h60
  text "Cut-out" at 8427.62,512.66 h30
  text "Cut-out" at 631.99,511.28 h30
  text "Cut-out" at 1200.96,511.28 h30
  text "Cut-out" at 2300.75,511.28 h30
  text "Cut-out" at 4244.23,511.28 h30
  text "Cut-out" at 6206.4,511.28 h30
  text "Cut-out" at 7019.11,511.28 h30
  text "Cut-out" at 7755.86,511.28 h30
  text "Cut-out" at 5032.06,506.66 h30
  text "FR4" at 648.74,354.36 h60
  text "FR4" at 1217.71,354.36 h60
  text "FR4" at 2317.5,354.36 h60
  text "FR4" at 4260.98,354.36 h60
  text "FR4" at 6223.15,354.36 h60
  text "FR4" at 7035.86,354.35 h60
  text "FR4" at 7772.61,354.36 h60
  text "FR4" at 8442.08,354.36 h60
  text "Cut-out" at 639.62,118.75 h30
  text "Cut-out" at 1208.6,118.75 h30
  text "Cut-out" at 2308.38,118.75 h30
  text "Cut-out" at 4251.86,118.75 h30
  text "Cut-out" at 6214.03,118.75 h30
  text "Cut-out" at 7026.74,118.75 h30
  text "Cut-out" at 7763.49,118.75 h30
  text "Cut-out" at 8432.96,118.75 h30
  text "Cut-out" at 5028,103.61 h30
  text "Stiffener Area" at 5485.62,-206.05 h60 r90
  text "Thickness : 0.20mm" at 5592.62,-206.05 h60 r90
  text "Material : FR4" at 5696.04,-206.05 h60 r90
  text "Material" at 4122.34,-225.09 h60
  text "FR4" at 4264.34,-337.67 h60
  text "Cut-out" at 619.82,-583.34 h30
  text "Cut-out" at 1188.79,-583.34 h30
  text "Cut-out" at 2288.57,-583.34 h30
  text "Cut-out" at 6194.22,-583.34 h30
  text "Cut-out" at 7006.94,-583.35 h30
  text "Cut-out" at 7743.69,-583.34 h30
  text "Cut-out" at 8493.16,-583.35 h30
  text "Cut-out" at 4251.86,-669.66 h30
  text "Cut-out" at 5028,-684.8 h30
  text "Cut-out" at 639.82,-973.34 h30
  text "Cut-out" at 1208.79,-973.34 h30
  text "Cut-out" at 2308.57,-973.34 h30
  text "Cut-out" at 6214.22,-973.34 h30
  text "Cut-out" at 7026.94,-973.35 h30
  text "Cut-out" at 7763.69,-973.34 h30
  text "Cut-out" at 8513.16,-973.35 h30
  text "Cut-out" at 635.76,-1376.39 h30
  text "Cut-out" at 1204.74,-1376.39 h30
  text "Cut-out" at 2304.52,-1376.39 h30
  text "Cut-out" at 6210.17,-1376.39 h30
  text "Cut-out" at 7022.88,-1376.4 h30
  text "Cut-out" at 7759.63,-1376.39 h30
  text "Cut-out" at 8509.1,-1376.39 h30
  text "Stiffener Area" at 7458.7,-1377.94 h60 r90
  text "Material : FR4" at 7560.9,-1389.36 h60 r90
  text "Stiffener Area" at 5764.93,-1395.05 h60 r90
  text "Material : FR4" at 5867.12,-1395.05 h60 r90
  text "Stiffener Area" at 8944.93,-1395.05 h60 r90
  text "Material : FR4" at 9047.12,-1395.05 h60 r90
  text "Thickness : 0.20mm" at 9148.62,-1395.05 h60 r90
  text "Stiffener Area" at 8187.33,-1396.87 h60 r90
  text "Thickness : 0.20mm" at 5968.62,-1404.85 h60 r90
  text "Thickness : 0.20mm" at 6798.86,-1404.85 h60 r90
  text "Material : FR4" at 8289.53,-1408.29 h60 r90
  text "Stiffener Area" at 190.62,-1425.05 h60 r90
  text "Thickness : 0.20mm" at 297.62,-1425.05 h60 r90
  text "Material : FR4" at 401.04,-1425.05 h60 r90
  text "Stiffener Area" at 1652.62,-1425.05 h60 r90
  text "Thickness : 0.20mm" at 1759.62,-1425.05 h60 r90
  text "Material : FR4" at 1863.04,-1425.05 h60 r90
  text "Stiffener Area" at 2749.62,-1425.05 h60 r90
  text "Thickness : 0.20mm" at 2856.62,-1425.05 h60 r90
  text "Material : FR4" at 2960.04,-1425.05 h60 r90
Drill Drawing:
  circle w10: c962.62,9168.83 r33.33
  lines w10: 929.29,8985.5 995.96,8985.5 995.96,9052.17 929.29,9052.17 929.29,8985.5
  lines w15: 869.5,8940.5 7879.6,8940.5 ; 869.5,9240.5 7879.6,9240.5 ; 1420.38,8790.5 1420.38,9390.5 ; 2020.22,8790.5 2020.22,9390.5 ; 3109.9,8790.5 3109.9,9390.5 ; 3615.78,8790.5 3615.78,9390.5 ; 4349.58,8790.5 4349.58,9390.5 ; 5849.13,8790.5 5849.13,9390.5 ; 6438.98,8790.5 6438.98,9390.5 ; 7184.78,8790.5 7184.78,9390.5 ; 869.5,8790.5 7879.6,8790.5 7879.6,9390.5 869.5,9390.5 869.5,8790.5
  text "Symbol" at 959.5,9285.5 h72
  text "Count" at 1465.38,9285.5 h72
  text "Hole Size" at 2065.22,9285.5 h72
  text "Plated" at 3154.9,9285.5 h72
  text "Hole Type" at 3660.78,9285.5 h72
  text "Drill Layer Pair" at 4394.58,9285.5 h72
  text "Via/Pad" at 5894.13,9285.5 h72
  text "Pad Shape" at 6483.98,9285.5 h72
  text "Template" at 7229.78,9285.5 h72
  text "16" at 1465.38,9135.5 h60
  text "1.000mm (39.37mil)" at 2065.22,9135.5 h60
  text "NPTH" at 3154.9,9135.5 h60
  text "Round" at 3660.78,9135.5 h60
  text "Top Layer - Bottom Layer" at 4394.58,9135.5 h60
  text "Pad" at 5894.13,9135.5 h60
  text "Rounded" at 6483.98,9135.5 h60
  text "c0hn100" at 7229.78,9135.5 h60
  text "233" at 1465.38,8985.5 h60
  text "0.300mm (11.81mil)" at 2065.22,8985.5 h60
  text "PTH" at 3154.9,8985.5 h60
  text "Round" at 3660.78,8985.5 h60
  text "Top Layer - Bottom Layer" at 4394.58,8985.5 h60
  text "Via" at 5894.13,8985.5 h60
  text "Rounded" at 6483.98,8985.5 h60
  text "(Mixed)" at 7229.78,8985.5 h60
  text "249 Total" at 1465.38,8835.5 h60

## Dimensions
464.62,91.22 to 8768.2,953.15 on Dimension
4784.2,6636 to 8573.83,-107.84 on Dimension